# Altium PCB PCB_CubeIO_RTD_V1.0_20261024.PcbDoc (part 1 of 2)
Units mil, origin at the board's own origin, x right, y up, seen from the top; angles counter-clockwise.
Board outline 9739 x 8533 mil, 4 copper layers (TopLayer, GND, VCC, BottomLayer); 78 components, 50 nets, 272 pads, 89 vias.
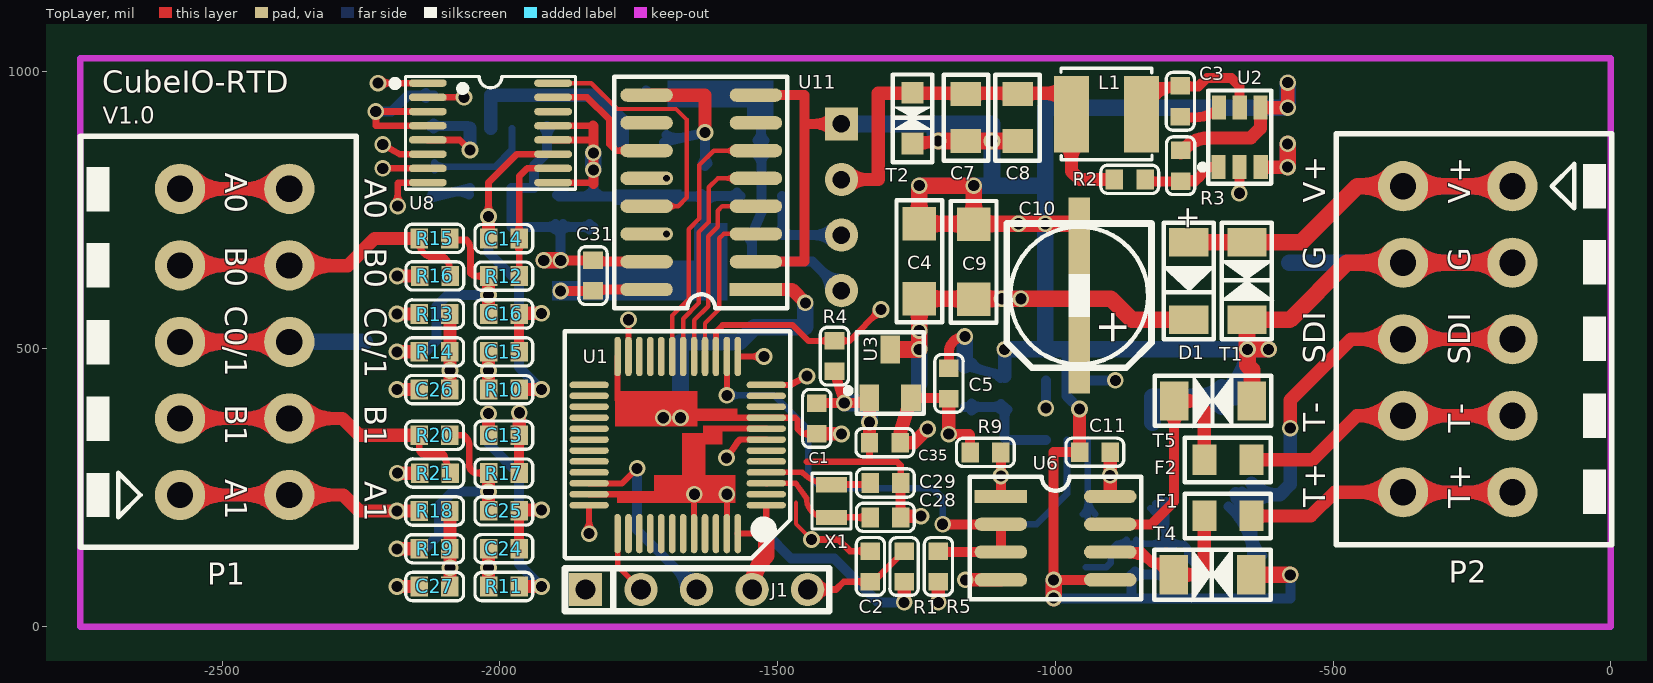
[diagram p0: TopLayer view]
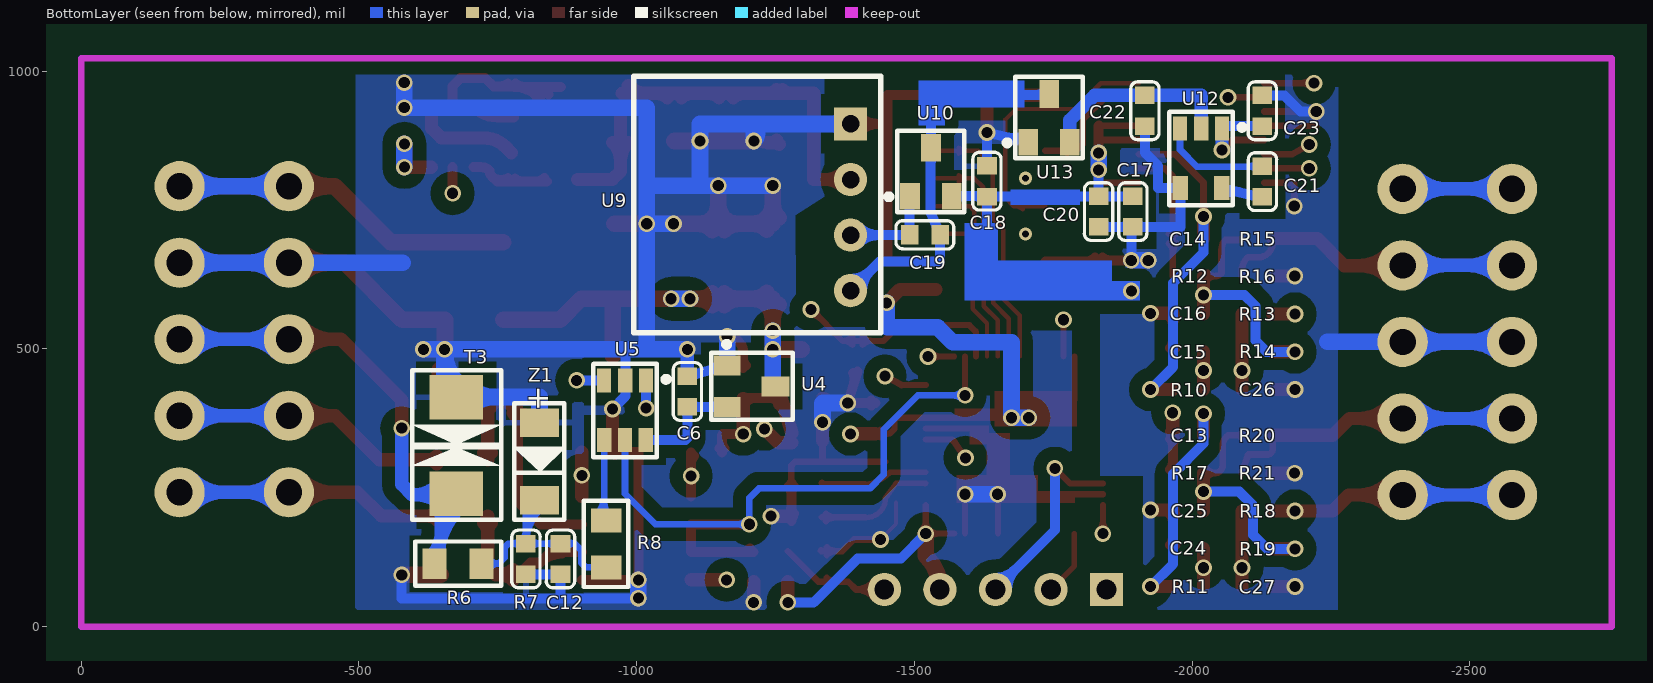
[diagram p1: BottomLayer view, seen from below]
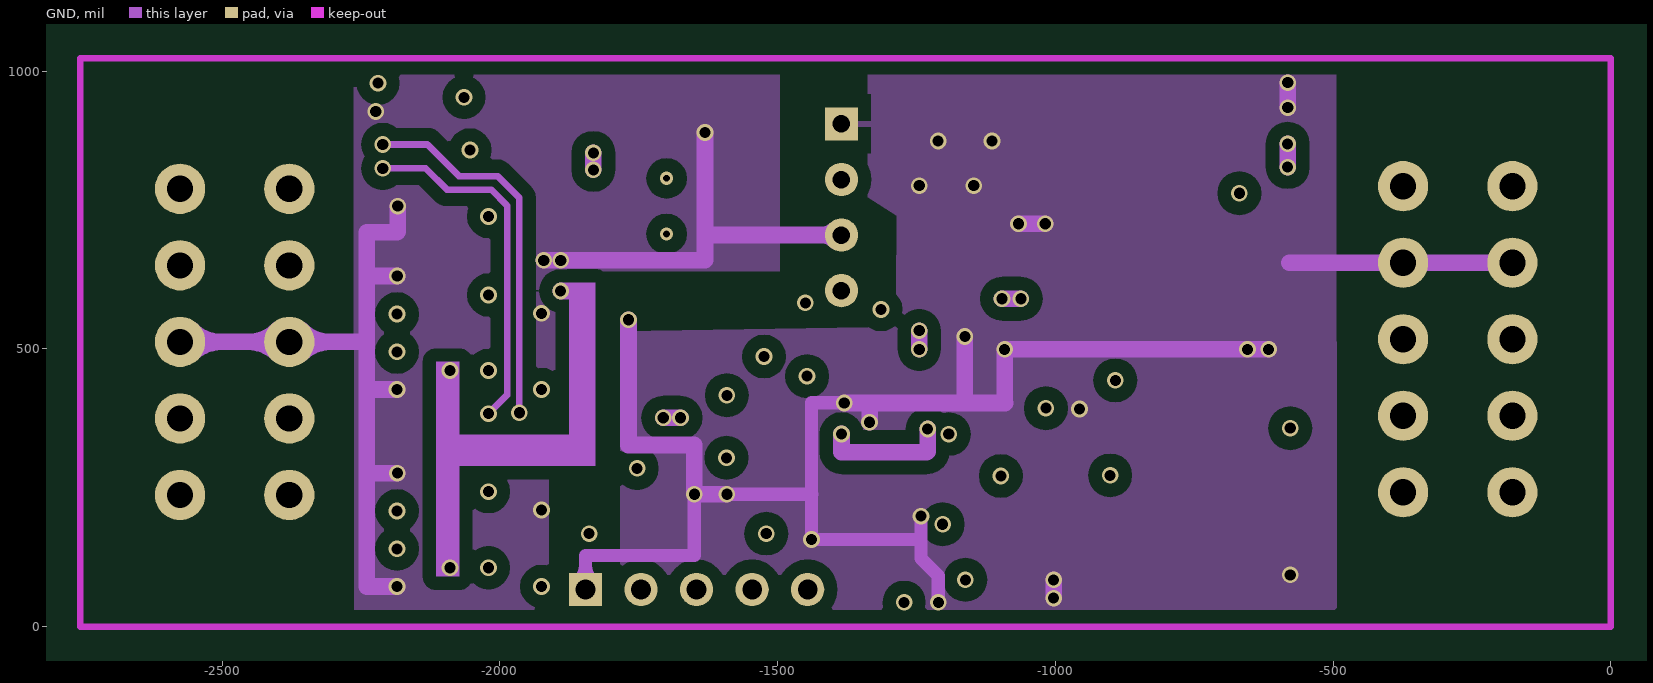
[diagram p2: GND]
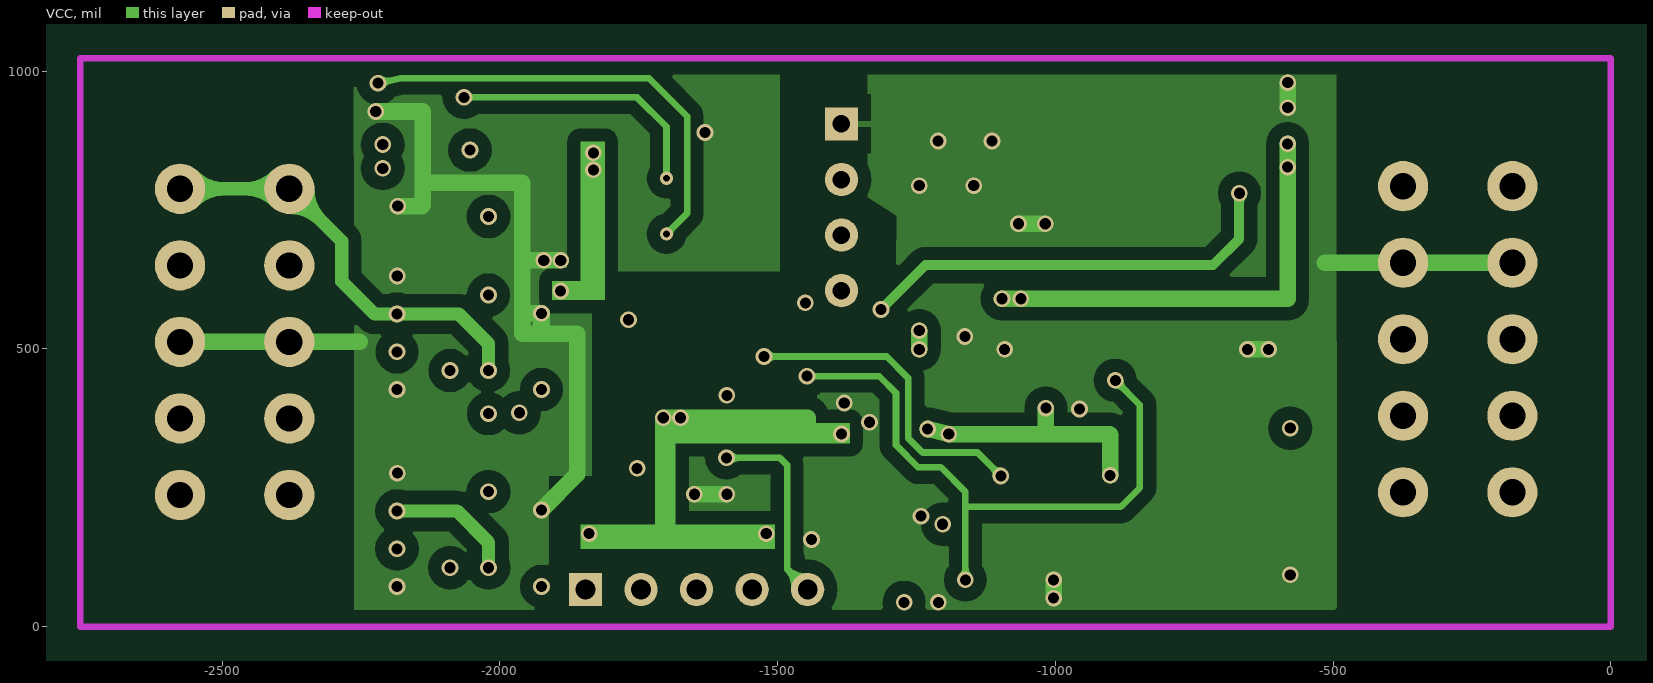
[diagram p3: VCC]

## Layer stack, top to bottom
TopLayer: signal copper 1.4
Dielectric: core 12.6, FR-4, Dk 4.8
GND: signal copper 1.4
Dielectric: prepreg 12.6, FR-4, Dk 4.8
VCC: signal copper 1.4
Dielectric: core 12.6, FR-4, Dk 4.8
BottomLayer: signal copper 1.4

## Board outline
-5100.31,4111.96 4638.69,4111.96 4638.69,-4391.04 -5100.31,-4391.04 -5100.31,4111.96 -5070.31,4141.96

## Design rules (kind name [scope] priority, off if disabled: settings)
Clearance [All] p1: gap=24
PolygonConnect Via [IsVia] p1: connectstyle=Direct reliefconductorwidth=10 reliefentries=4 polygonreliefangle="90 Angle"
PolygonConnect [All] p2: connectstyle=Relief reliefconductorwidth=10 reliefentries=4 polygonreliefangle="90 Angle"
RoutingLayers [All] p1: top layer_v5=TRUE mid layer 1_v5=FALSE mid layer 2_v5=FALSE bottom layer_v5=TRUE
RoutingPriority [All] p1: routingpriority=4
RoutingVias [All] p1: holewidth=20 width=30 viastyle="Through Hole" minholewidth=20 minwidth=30 maxholewidth=20 maxwidth=30
SilkscreenOverComponentPads [All] p1: minsilkscreentomaskgap=10
SolderMaskExpansion [All] p1: expansion=4
TestPointUsage [All] p1: valid=0 allowmultiple=FALSE
Testpoint [All] p1: side=15 testpointundercomponent=TRUE minsize=40 maxsize=100 preferedsize=60 minholesize=20 maxholesize=40 preferedholesize=32 testpointgrid=1 style=1023 order=0-112345678
Width [All] p1: maxlimit=236.22 minlimit=6 preferedwidth=8
21 further rules are at their usual default settings.

## Classes and differential pairs
component class AI: C13 C14 C15 C16 C17 C18 C19 C20 C21 C22 C23 C24 C25 C26 C27 C31 P1 R10 R11 R12 R13 R14 R15 R16 R17 R18 R19 R20 R21 U8 U9 U10 U11 U12 U13
component class CPU: 5 5.1K 6 BT1 C1 C2 C3 C4 C5 C6 C7 C8 C9 C10 C11 C12 C28 C29 C35 COM D1 D18 D19 F1 F2 J1 JTAG1 L1 L3 P2 P6 P7 P8 PWR PWR1 Q8 R1 R2 R3 R4 R5 R6 R7 R8 R9 RUN SW6 SW7 T1 T2 T3 T4 T5 U1 U2 U3 U4 U5 U6 X1 X2 X3 Z1
component class ATTACH: ATT1 ATT2 ATT3 ATT4 ATT5 ATT6 ATT7 ATT8 ATT9

## Components (designator, comment, footprint, x,y, rotation, side; value= is the part's Value field where it differs from the comment)
C1 "100nf/50V" RC0603(1) -1429.96,347.87 r90 top
C2 "100nf/50V" RC0603(1) -1333.38,81.28 r90 top
C3 "100nf/50V" RC0603(1) -774.59,972.87 r270 top
C4 "10uf/50V" RC1206 -1244.96,590.27 r90 top
C5 "10uf/25V" RC0603(1) -1191.96,410.85 r90 top
C6 "10uf/25V" RC0603(1) -1090.96,396.27 r90 bottom
C7 "22uf/16V" RC0805 -1160.96,958.87 r270 top
C8 "22uf/16V" RC0805 -1067.96,958.87 r270 top
C9 "10uf/50V" RC1206 -1146.96,589.27 r90 top
C10 "47uf/50V" SMD-EC-F6.3 -956.96,488.27 r90 top
C11 "100nf/50V" RC0603(1) -955.96,314.27 r0 top
C12 "220pf/50V" RC0603(1) -863.25,148.78 r270 bottom
C13 "10nf/50V" RC0603(1) -2020,345 r0 top
C14 "10nf/50V" RC0603(1) -2020,699 r0 top
C15 "100nf/50V" RC0603(1) -2020,495.19 r0 top
C16 "100nf/50V" RC0603(1) -2020,563.3 r0 top
C17 "10uf/25V" RC0603(1) -1893.72,774.38 r270 bottom
C18 "100nf/50V" RC0603(1) -1631,829 r270 bottom
C19 "10uf/25V" RC0603(1) -1546,705 r0 bottom
C20 "10uf/25V" RC0603(1) -1832,774.38 r270 bottom
C21 "10uf/25V" RC0603(1) -2126.29,774.08 r90 bottom
C22 "10uf/25V" RC0603(1) -1914.63,901.8 r90 bottom
C23 "10uf/25V" RC0603(1) -2126.75,955.8 r270 bottom
C24 "100nf/50V" RC0603(1) -2020,140.64 r0 top
C25 "100nf/50V" RC0603(1) -2020,208.75 r0 top
C26 "100nf/50V" RC0603(1) -2144.5,427.08 r0 top
C27 "100nf/50V" RC0603(1) -2144.5,72.53 r0 top
C28 "6pf(+/-0.25pf)/50V,COG" RC0603(1) -1278.96,196.27 r180 top
C29 "6pf(+/-0.25pf)/50V,COG" RC0603(1) -1278.96,258.27 r180 top
C31 "100nf/50V" RC0603(1) -1832,659 r270 top
C35 "10uf/25V" RC0603(1) -1279.96,330.87 r180 top
D1 "IN5819WS" SOD-123 -759.96,692.27 r270 top
F1 "自恢复保险丝50mA/60V" RC0805 -646.96,199.27 r180 top
F2 "自恢复保险丝50mA/60V" RC0805 -646.96,300.27 r180 top
J1 "单排针,5P" SIP-5(1) -1845.96,66.87 r180 top
L1 "10uH" SMD_L4.0-W4.0_FNR40XXS -907.96,922.87 r180 top
P1 "接线焊接焊盘" KC-2604P-3.5A-5P（快接侧出线直针,淘宝:宇宙悍将旗舰店） -2576,237 r90 top locked
P2 "外部接线焊盘" KC-2604P-3.5A-5P（快接侧出线直针,淘宝:宇宙悍将旗舰店） -177,793 r270 top locked
R1 "10K,1%" RC0603(1) -1271.96,135.27 r270 top
R2 "200K,1%" RC0603(1) -838.96,804.87 r180 top
R3 "62K,1%" RC0603(1) -773.96,856.87 r270 top
R4 "200K,1%" RC0603(1) -1397.96,459.87 r90 top
R5 "10K,1%" RC0603(1) -1210.96,81.27 r90 top
R6 "510ohm,1%" RC0805 -720.96,113.27 r0 bottom
R7 "200K,1%" RC0603(1) -800.25,94.78 r90 bottom
R8 "510ohm,1%" RC0805 -944.96,191.27 r270 bottom
R9 "5.1K,1%" RC0603(1) -1098.96,313.27 r180 top
R10 "2K,0.1%" RC0603(1) -2020,427.08 r0 top
R11 "2K,0.1%" RC0603(1) -2020,72.53 r0 top
R12 "2K,0.1%" RC0603(1) -2020,631.41 r0 top
R13 "20K,0.1%" RC0603(1) -2090.44,562.42 r180 top
R14 "20K,0.1%" RC0603(1) -2090.44,494.31 r180 top
R15 "300ohm,0.1%" RC0603(1) -2090.44,698.64 r180 top
R16 "20K,0.1%" RC0603(1) -2090,631 r180 top
R17 "2K,0.1%" RC0603(1) -2020,276.86 r0 top
R18 "20K,0.1%" RC0603(1) -2090.44,207.87 r180 top
R19 "20K,0.1%" RC0603(1) -2090.44,139.76 r180 top
R20 "300ohm,0.1%" RC0603(1) -2090.44,344.09 r180 top
R21 "20K,0.1%" RC0603(1) -2089.95,276 r180 top
T1 "SMF28CA" SOD-123-TVS -654.96,692.27 r270 top
T2 "GBLC05C" SOD-323-ESD-GBLCxx/UDD32CxxL01(1) -1257,961.1 r270 top
T3 "SMBJ28CA" "DO-214AA(SMB) -TVS" -674.96,239.27 r90 bottom
T4 "SMF6.5CA" SOD-123-TVS -786.96,93.27 r0 top
T5 "SMF6.5CA" SOD-123-TVS -785.96,406.27 r0 top
U1 "STM32L072CZT7" LQFP48_N -1679.96,326.87 r180 top
U2 "AP63200WU-7(ADJ)" SOT23-6(WIDEPAD) -705.96,827.27 r0 top
U3 "HT7533S" SOT23-3(1) -1334.96,411.87 r0 top
U4 "HT7550S" SOT23-3(1) -1162.96,470.27 r270 bottom
U5 "74LVC1T45DBVR" SOT23-6(WIDEPAD) -1016.96,443.27 r0 bottom
U6 "TP8485E-SR" SO-8-150mil -1097.96,234.27 r0 top
U8 "ADS1220IPWR" TSSOP-16_L5.0-W4.4-P0.65-LS6.4-BL -2017,889 r270 top
U9 "B0303S-1WR2(德旭电子)" MORSUN_B_S_1W-LAY -1385,905 r270 bottom
U10 "AP2210N-3.3TRG1" SOT23-3(1) -1492,775 r180 bottom
U11 "PAI-141U31" SO-16 -1539,607 r180 top
U12 "TPS60400DBVR" SOT23-5(WIDEPAD) -2054,897 r0 bottom
U13 "AP2210N-2.5TRE1" SOT23-3(1) -1705,872 r180 bottom
X1 "32.768kHz" OSC-2012-2P-SMD -1402.96,225.87 r270 top
Z1 "MMSZ4693(7.5V稳压管)" SOD-123 -824.96,367.27 r270 bottom

## Footprints (in the part's own frame and the unit in brackets; to place one, negate y for a bottom-side part, rotate by r counter-clockwise, add the part's x,y. Pads: shape width x height; smd on the part's side, far side on the other; paste and mask are expansions set on the pad)
"DO-214AA(SMB) -TVS" [mil]
  rect 80x96 smd: 1(0,0) 2(174,0)
  silkscreen extent -47,-82 222,80
KC-2604P-3.5A-5P（快接侧出线直针,淘宝:宇宙悍将旗舰店） [mm] "淘宝pokerface0411订单号: 5057329177195112327,宇宙悍将旗舰店"
  round 2.3 hole 1.2: 1(0,0) 1(0,-5) 2(3.5,-5) 2(3.5,0) 3(7,-5) 3(7,0) 4(10.5,-5) 4(10.5,0) 5(14,-5) 5(14,0)
  silkscreen extent -2.4,-8.05 16.4,4.55
LQFP48_N [mm] "Thin QFP, 48-Leads, Body 7x7mm, Pitch 0.5mm, IPC Medium Density"
  oval 1.8x0.3 smd: 1(-4.05,2.75) 2(-4.05,2.25) 3(-4.05,1.75) 4(-4.05,1.25) 5(-4.05,0.75) 6(-4.05,0.25) 7(-4.05,-0.25) 8(-4.05,-0.75) 9(-4.05,-1.25) 10(-4.05,-1.75) 11(-4.05,-2.25) 12(-4.05,-2.75) 25(4.05,-2.75) 26(4.05,-2.25) 27(4.05,-1.75) 28(4.05,-1.25) 29(4.05,-0.75) 30(4.05,-0.25) 31(4.05,0.25) 32(4.05,0.75) 33(4.05,1.25) 34(4.05,1.75) 35(4.05,2.25) 36(4.05,2.75)
  oval 0.3x1.8 smd: 13(-2.75,-4.05) 14(-2.25,-4.05) 15(-1.75,-4.05) 16(-1.25,-4.05) 17(-0.75,-4.05) 18(-0.25,-4.05) 19(0.25,-4.05) 20(0.75,-4.05) 21(1.25,-4.05) 22(1.75,-4.05) 23(2.25,-4.05) 24(2.75,-4.05) 37(2.75,4.05) 38(2.25,4.05) 39(1.75,4.05) 40(1.25,4.05) 41(0.75,4.05) 42(0.25,4.05) 43(-0.25,4.05) 44(-0.75,4.05) 45(-1.25,4.05) 46(-1.75,4.05) 47(-2.25,4.05) 48(-2.75,4.05)
  silkscreen extent -5.16,-5.21 5.16,5.18
MORSUN_B_S_1W-LAY [mil]
  rect 60x60 hole 31.5: 1(0,0)
  round 60 hole 31.5: 2(100,0) 3(200,0) 4(300,0)
  silkscreen extent -86,-390 376,55
OSC-2012-2P-SMD [mm]
  rect 0.7x1.4 smd: 1(-0.75,0) 2(0.75,0)
  silkscreen extent -1.27,-0.89 1.27,0.89
RC0603(1) [mm]
  rect 0.8x0.9 smd: 1(-0.013,-0.007) 2(1.387,-0.007)
  silkscreen extent -0.64,-0.66 2.01,0.64
RC0805 [mm]
  rect 1.1x1.4 smd: 1(0,0) 2(2.15,0)
  silkscreen extent -0.89,-1.02 3.05,1.02
RC1206 [mil] "1/4W 3.2X1.6"
  rect 60x60 smd: 1(0,0) 2(135,0)
  silkscreen extent -42,-41 177,41
SIP-5(1) [mil]
  rect 60x60 hole 35.43: 1(0,0)
  round 60 hole 35.43: 2(-100,0) 3(-200,0) 4(-300,0) 5(-400,0)
  silkscreen extent -439,-38 37,39
SMD-EC-F6.3 [mm]
  rect 3.5x1 smd: 1(0,0) 2(5.475,0)
  silkscreen extent -0.56,-3.31 6.04,3.31
SMD_L4.0-W4.0_FNR40XXS [mm]
  rect 1.6x3.5 smd: 1(-1.6,0) 2(1.6,0)
  silkscreen extent -2.08,-2.1 2.08,2.1
SO-8-150mil [mm]
  rect 2.4x0.61 smd: 1(0,0)
  oval 2.4x0.61 smd: 2(0,-1.27) 3(0,-2.54) 4(0,-3.81) 5(5,-3.81) 6(5,-2.54) 7(5,-1.27) 8(5,0)
  silkscreen extent -1.42,-4.7 6.43,0.89
SO-16 [mm]
  rect 2.4x0.61 smd: 1(0,0)
  oval 2.4x0.61 smd: 2(0,-1.27) 3(0,-2.54) 4(0,-3.81) 5(0,-5.08) 6(0,-6.35) 7(0,-7.62) 8(0,-8.89) 9(5,-8.89) 10(5,-7.62) 11(5,-6.35) 12(5,-5.08) 13(5,-3.81) 14(5,-2.54) 15(5,-1.27) 16(5.004,0)
  silkscreen extent -1.42,-9.73 6.48,0.85
SOD-123 [mm]
  rect 1.3x1.8 smd: 1(0,0) 2(3.556,0)
  silkscreen extent -0.89,-1.22 4.44,1.22
SOD-123-TVS [mm]
  rect 1.3x1.8 smd: 1(0,0) 2(3.556,0)
  silkscreen extent -0.89,-1.24 4.44,1.24
SOD-323-ESD-GBLCxx/UDD32CxxL01(1) [mm]
  rect 1x1 smd: 1(0,0) 2(2.32,0)
  silkscreen extent -0.84,-0.91 3.17,0.9
SOT23-3(1) [mm]
  rect 0.9x1.2 smd: 1(0,0) 2(1.905,0)
  rect 0.9x1.27 smd: 3(0.965,2.21)
  silkscreen extent -1.09,-0.74 2.49,3
SOT23-5(WIDEPAD) [mm]
  rect 0.65x1.1 smd: 1(0,0) 2(0.95,0) 3(1.925,0)
  rect 0.7x1.1 smd: 4(1.912,2.723) 5(0.012,2.723)
  silkscreen extent -1.04,-0.76 2.41,3.51
SOT23-6(WIDEPAD) [mm]
  rect 0.65x1.1 smd: 1(0,0) 2(0.95,0) 3(1.925,0) 4(1.912,2.723) 5(0.965,2.718) 6(0.012,2.723)
  silkscreen extent -0.86,-0.76 2.41,3.51
TSSOP-16_L5.0-W4.4-P0.65-LS6.4-BL [mil]
  oval 13.5x68.17 smd paste+2: 1(-89.57,-112.82) 2(-63.98,-112.82) 3(-38.39,-112.82) 4(-12.79,-112.82) 5(12.8,-112.82) 6(38.39,-112.82) 7(63.98,-112.82) 8(89.57,-112.82) 9(89.57,112.83) 10(63.98,112.83) 11(38.39,112.83) 12(12.8,112.83) 13(-12.79,112.83) 14(-38.39,112.83) 15(-63.98,112.83) 16(-89.57,112.83)
  silkscreen extent -101,-178 101,153

## Part data
C1 C2 C3 C11 C15 C16 C18 C24 C25 C26 C27 C31: library part CAP, "电容,100nf/50V,贴片,0603"
C4 C9: library part CAPACITOR_POL, "电容,10uf/50V,贴片,1206"
C5: library part ELECTRO1, "电容,10uf/25V,贴片,0805"
C6 C19 C20 C35: library part CAP, "电容,10uf/25V,贴片,0805"
C7 C8: library part ELECTRO1, "电容,22uf/16V,贴片,0805"
C10: library part CAPACITOR_POL, "电解电容,47uf/50V,贴片,D6.3L5.4"
C12: library part CAP, "电容,220pf/50V,贴片,0603"
C13 C14: library part CAP, "电容,10nf/50V,贴片,0603"
C17 C21 C22 C23: library part CAP, "电容,10uf/25V,贴片,0603"
C28 C29: library part CAP, "电容,6pf(+/-0.25pf)/50V,COG,贴片,0603"
D1: library part DIODE, "肖特基二极管,IN5819WS,贴片,SOD-123(1206)"
F1 F2: library part FUSE, "自恢复保险丝,自恢复保险丝50mA/60V,贴片,1206"
J1: library part "Header 5", "插针,单排针,直插,2.54MM间距,针高11MM,5P"
L1: library part INDUCTOR, "功率电感,10uH,20%,FHD4020S-100MT,贴片,SMD,4*4*2mm"
P1 P2: library part MHDR1X5, "Header, 5-Pin"
R1: library part RES_1, "电阻,10K,1%,贴片,0603"
R2 R4 R7: library part RESISTOR, "电阻,200K,1%,贴片,0603"
R3: library part RESISTOR, "电阻,62K,1%,贴片,0603"
R5: library part RESISTOR, "电阻,10K,1%,贴片,0603"
R6 R8: library part RESISTOR, "电阻,510ohm,1%,贴片,0805"
R9: library part RESISTOR, "电阻,5.1K,1%,贴片,0603"
R10 R11 R12 R17: library part RESISTOR, "电阻,2K,0.1%,贴片,0603"
R13 R14 R16 R18 R19 R21: library part RESISTOR, "电阻,20K,0.1%,贴片,0603"
R15 R20: library part RESISTOR, "电阻,300ohm,0.1%,贴片,0603"
T1 T3: library part TVS, "抗雷击二极管,SMF28CA,贴片,SOD-123"
T2: library part TVS, "抗雷击二极管,GBLC05C,贴片,SOD-323"
T4 T5: library part TVS, "抗雷击二极管,SMF6.5CA,贴片,SOD-123"
U1: library part STM32L051C8T6
U2: library part SCT2332(DC/DC), "电源,AP63200WU-7(ADJ),贴片,TSOT23-6L"
U3: library part HT7530S(UMW友台半导体), "电源,ME6203A33M3G(LDO,40V输入,3.3V输出),贴片,SOT-23"
U4: library part HT7530S(UMW友台半导体), "电源,ME6203A50M3G(LDO,40V输入,5V输出),贴片,SOT-23"
U5: library part 74LVC1T45, "74系列,74LVC1T45DBVR,贴片,SOT-23-6"
U6: library part MAX485, "RS485通讯,TP8485E-SR,贴片,SO-8"
U8: "AD转换器,ADS1220IPWR(24位AD转换),贴片,TSSOP-16"
U9: library part MORSUN_B0505S_1W, "电源DCDC,B0303S-1WR2(德旭电子),直插,SIP"
U10: library part HT7530S(UMW友台半导体), "电源,AP2210N-3.3TRG1(DIODES美台),贴片,SOT-23"
U11: "光耦,PAI-141U31,贴片,SO-16"
U12: library part TPS60400, "电源,TPS60400DBVR,贴片,SOT-23-5"
U13: library part HT7530S(UMW友台半导体), "电源,AP2210N-2.5TRE1(DIODES美台),贴片,SOT-23"
X1: library part XTAL, "晶振,SC-20S(32.768kHz,20PPM,7pF, Seiko精工),贴片,SMD-2012-2P"
Z1: library part ZENER, "稳压二极管,MMSZ4693(7.5V稳压管),贴片,SOD-123"

## Via types
v1: diameter 30, hole 20, TopLayer to BottomLayer, 87 vias
v2: diameter 24, hole 12, TopLayer to BottomLayer, 2 vias

## Nets (pads, with @x,y where several pads share a name; then routed paths per layer and width w, separated by ;. In a path a pad name is that pad's centre, name@x,y a point inside that pad or via, vN(x,y) a via of type N, cw(c..) or ccw(c..) an arc to the next point about the centre after c; other vN are vias at no path point)
+3V5: C7.1 C8.1 L1.2 R2.2 T2.1 U9.2 | length 1426.5
  TopLayer w24: U9.2@-1385,805 -1319,805 -1319,960 -1318.9,960.1 -1257,960.1 L1.2@-974,960.1 ; L1.2@-970.95,922.87 -970.95,819.95 -956.16,805.16 R2.2@-893.58,805.16 ; -1341.54,805 cw(c-1341.54,848.46) -1372.27,817.73 ccw(c-1341.54,848.46) -1341.54,805 ; -1341.54,805 ccw(c-1341.54,761.54) -1372.27,792.27 cw(c-1341.54,761.54) -1341.54,805 ; -970.95,838.4 cw(c-923.88,838.4) -957.16,871.69 ccw(c-923.88,838.4) -970.95,838.4 ; -970.95,838.4 ccw(c-1018.02,838.4) -984.74,871.69 cw(c-1018.02,838.4) -970.95,838.4 ; -1277.97,960.1 ccw(c-1277.97,982.07) -1262.43,966.54 cw(c-1277.97,982.07) -1277.97,960.1 ; T2.1@-1251.57,966.54 ccw(c-1236.03,982.07) -1236.03,960.1 cw(c-1236.03,982.07) T2.1@-1251.57,966.54 ; -1193.14,960.1 cw(c-1193.14,932.6) -1173.69,952.05 ccw(c-1193.14,932.6) -1193.14,960.1 ; C7.1@-1148.23,952.05 cw(c-1128.78,932.6) -1128.78,960.1 ccw(c-1128.78,932.6) C7.1@-1148.23,952.05 ; -1100.14,960.1 cw(c-1100.14,932.6) -1080.69,952.05 ccw(c-1100.14,932.6) -1100.14,960.1 ; C8.1@-1055.23,952.05 cw(c-1035.78,932.6) -1035.78,960.1 ccw(c-1035.78,932.6) C8.1@-1055.23,952.05 ; -1018.43,960.1 ccw(c-1018.43,1007.76) -984.74,974.06 cw(c-1018.43,1007.76) -1018.43,960.1 ; -1017.6,960.1 cw(c-1017.6,913.62) -984.74,946.49 ccw(c-1017.6,913.62) -1017.6,960.1
+5V: C6.1 U4.2 U5.6 | length 368.3
  BottomLayer w18: U4.2@-1162.96,395.27 -1162.46,395.78 C6.1@-1091.25,395.78 -1091.25,339.33 ; -1087.98,336.06 U5.6@-1016.49,336.06 ; -1109.51,395.78 cw(c-1109.51,379.49) -1097.99,391.01 ccw(c-1109.51,379.49) -1109.51,395.78 ; -1109.51,395.78 ccw(c-1109.51,412.07) -1097.99,400.55 cw(c-1109.51,412.07) -1109.51,395.78 ; -1091.25,379.49 cw(c-1074.96,379.49) -1086.48,391.01 ccw(c-1074.96,379.49) -1091.25,379.49 ; -1091.25,379.49 ccw(c-1107.54,379.49) -1096.02,391.01 cw(c-1107.54,379.49) -1091.25,379.49 ; U4.2@-1150.89,389.11 cw(c-1134.8,373.02) -1134.8,395.78 ccw(c-1134.8,373.02) U4.2@-1150.89,389.11 ; U4.2@-1150.89,401.44 ccw(c-1137.22,415.1) -1137.22,395.78 cw(c-1137.22,415.1) U4.2@-1150.89,401.44
+24V: C4.1 C9.1 C10.1 D1.2 U2.3 U3.3 U4.3 | length 2907.4
  TopLayer w24: U2.3@-630.16,827.27 v1(-581.73,827.27)
  TopLayer w30: U3.3@-1296.96,498.87 -1245.36,498.87 v1(-1244.96,499.27) ; v1@-1244.96,501.27 C4.1@-1244.96,590.27 -1031.96,590.27 -899.96,590.27 -861.96,552.27 -836.96,552.27 D1.2@-759.96,552.27 ; C10.1@-956.96,488.27 -956.96,587.31 -954,590.27 ; v1(-581.73,827.27) v1(-581.73,869.27) ; -1244.96,554.06 cw(c-1208.75,554.06) C4.1@-1234.35,579.67 ; -1244.96,554.06 ccw(c-1281.17,554.06) -1255.57,579.67 cw(c-1281.17,554.06) -1244.96,554.06 ; -1244.96,554.06 cw(c-1208.75,554.06) C4.1@-1234.35,579.67 ; C4.1@-1234.35,579.67 cw(c-1208.75,554.06) -1208.75,590.27 ; C4.1@-1234.35,579.67 cw(c-1208.75,554.06) -1208.75,590.27 ; -1208.75,590.27 cw(c-1208.75,626.49) -1234.35,600.88 ccw(c-1208.75,626.49) -1208.75,590.27 ; -1185.59,590.27 cw(c-1185.59,550.65) -1157.57,578.67 ccw(c-1185.59,550.65) -1185.59,590.27 ; -1180.76,590.27 ccw(c-1180.76,623.07) -1157.57,599.88 cw(c-1180.76,623.07) -1180.76,590.27 ; C9.1@-1136.35,578.67 cw(c-1108.33,550.65) -1108.33,590.27 ccw(c-1108.33,550.65) C9.1@-1136.35,578.67 ; C9.1@-1136.35,599.88 ccw(c-1113.16,623.07) -1113.16,590.27 cw(c-1113.16,623.07) C9.1@-1136.35,599.88
  GND w30: v1(-1244.96,499.27) v1(-1244.96,532.87) ; v1(-1096,590.27) v1(-1062,590.27) ; v1(-581.73,827.27) v1(-581.73,869.27)
  VCC w30: v1(-1244.96,499.27) v1(-1244.96,532.87) ; -587.27,590.27 v1(-1096,590.27) -581.73,590.27 v1(-581.73,827.27) v1(-581.73,869.27)
  BottomLayer w30: U4.3@-1244.96,437.27 v1(-1244.96,499.27) v1(-1244.96,532.87) ; v1(-1096,590.27) v1(-1062,590.27) ; v1(-581.73,827.27) v1(-581.73,869.27)
+24X: D1.1 P2.1 T1.1 | length 1740
  TopLayer w30: D1.1@-759.96,692.27 T1.1@-654.96,692.27 -556.73,692.27 -456,793 P2.1@-177,793 ; -446.94,793 cw(c-446.94,719.91) -395.26,771.59 ccw(c-446.94,719.91) -446.94,793 ; -446.94,793 ccw(c-446.94,866.09) -395.26,814.41 cw(c-446.94,866.09) -446.94,793 ; -300.76,793 cw(c-300.76,866.09) -352.44,814.41 ccw(c-300.76,866.09) -300.76,793 ; -300.76,793 ccw(c-300.76,719.91) -352.44,771.59 cw(c-300.76,719.91) -300.76,793 ; -250.09,793 cw(c-250.09,719.91) -198.41,771.59 ccw(c-250.09,719.91) -250.09,793 ; -250.09,793 ccw(c-250.09,866.09) -198.41,814.41 cw(c-250.09,866.09) -250.09,793
  BottomLayer w30: P2.1@-373.85,793 P2.1@-177,793 ; P2.1@-352.44,771.59 cw(c-300.76,719.91) -300.76,793 cw(c-300.76,866.09) P2.1@-352.44,814.41 ; P2.1@-198.41,771.59 ccw(c-250.09,719.91) -250.09,793 ccw(c-250.09,866.09) P2.1@-198.41,814.41
A: F1.2 T4.1 U6.6 | length 680.4
  TopLayer w18: U6.6@-901.11,134.27 -844.96,134.27 -825.96,115.27 ; T4.1@-786.96,93.27 -808.96,115.27 -825.96,115.27 ; -825.96,115.27 cw(c-825.96,91.04) -802.81,98.21 ccw(c-825.96,91.04) -825.96,115.27 ; U6.6@-865.87,131.27 cw(c-865.87,73.56) -825.06,114.37 ccw(c-865.87,73.56) U6.6@-865.87,131.27 ; U6.6@-864.99,131.41 cw(c-856.05,102.28) -834.51,123.82 ccw(c-856.05,102.28) U6.6@-864.99,131.41
  TopLayer w24: T4.1@-786.96,93.27 -745.96,93.27 -731.61,107.63 F1.2@-731.61,199.27 F1.2@-730.37,198.04 ; -754.15,93.27 cw(c-754.15,126.08) -777.35,102.88 ccw(c-754.15,126.08) -754.15,93.27 ; -754.15,93.27 ccw(c-754.15,60.46) -777.35,83.66 cw(c-754.15,60.46) -754.15,93.27 ; -731.61,170.06 cw(c-708.3,170.06) -724.78,186.54 ccw(c-708.3,170.06) -731.61,170.06 ; -731.61,170.06 ccw(c-754.91,170.06) -738.43,186.54 cw(c-754.91,170.06) -731.61,170.06
A0: C15.1 P1.5 R10.1 R13.2 | length 2545.5
  TopLayer w24: P1.5@-2576,788.18 P1.5@-2379.15,788.18 ; P1.5@-2552.47,764.65 cw(c-2495.67,707.85) -2495.67,788.18 cw(c-2495.67,868.52) P1.5@-2552.47,811.71 ; P1.5@-2402.68,764.65 ccw(c-2459.48,707.85) -2459.48,788.18 ccw(c-2459.48,868.52) P1.5@-2402.68,811.71 ; v1(-2185.23,562.71) R13.2@-2145.06,562.71 ; R10.1@-2020.5,426.79 C15.1@-2020.5,494.9
  VCC w24: P1.5@-2576,788.18 P1.5@-2379.15,788.18 ; P1.5@-2359.18,788.18 P1.5@-2379.15,788.18 ; v1(-2020.5,461) -2020.5,509.5 -2073.71,562.71 v1(-2185.23,562.71) -2225.71,562.71 -2285,622 -2285,694.03 P1.5@-2379.15,788.18 ; -2495.67,788.18 cw(c-2495.67,868.52) -2552.47,811.71 ccw(c-2495.67,868.52) -2495.67,788.18 ; -2495.67,788.18 ccw(c-2495.67,707.85) -2552.47,764.65 cw(c-2495.67,707.85) -2495.67,788.18 ; -2459.48,788.18 cw(c-2459.48,707.85) -2402.68,764.65 ccw(c-2459.48,707.85) -2459.48,788.18 ; -2459.48,788.18 ccw(c-2459.48,868.52) -2402.68,811.71 cw(c-2459.48,868.52) -2459.48,788.18 ; -2322.34,731.38 cw(c-2265.54,788.18) -2345.87,788.18 ccw(c-2265.54,788.18) -2322.34,731.38 ; -2322.34,731.38 ccw(c-2379.15,674.57) -2379.15,754.91 cw(c-2379.15,674.57) -2322.34,731.38
  BottomLayer w24: P1.5@-2576,788.18 P1.5@-2379.15,788.18 ; P1.5@-2552.47,764.65 cw(c-2495.67,707.85) -2495.67,788.18 cw(c-2495.67,868.52) P1.5@-2552.47,811.71 ; P1.5@-2402.68,764.65 ccw(c-2459.48,707.85) -2459.48,788.18 ccw(c-2459.48,868.52) P1.5@-2402.68,811.71
A1: C24.1 P1.1 R11.1 R18.2 | length 1951.1
  TopLayer w24: P1.1@-2576,237 -2282,237 -2253.16,208.16 v1(-2185.23,208.16) R18.2@-2145.06,208.16 ; R11.1@-2020.5,72.24 C24.1@-2020.5,140.35 ; -2495.67,237 cw(c-2495.67,317.33) -2552.47,260.53 ccw(c-2495.67,317.33) -2495.67,237 ; -2495.67,237 ccw(c-2495.67,156.67) -2552.47,213.47 cw(c-2495.67,156.67) -2495.67,237 ; -2459.48,237 cw(c-2459.48,156.67) -2402.68,213.47 ccw(c-2459.48,156.67) -2459.48,237 ; -2459.48,237 ccw(c-2459.48,317.33) -2402.68,260.53 cw(c-2459.48,317.33) -2459.48,237 ; -2298.82,237 cw(c-2298.82,317.33) -2355.62,260.53 ccw(c-2298.82,317.33) -2298.82,237 ; -2298.82,237 ccw(c-2298.82,156.67) -2355.62,213.47 cw(c-2298.82,156.67) -2298.82,237
  VCC w24: v1(-2185.23,208.16) -2077.16,208.16 -2020.5,151.5 v1(-2020.5,106)
  BottomLayer w24: P1.1@-2576,237 P1.1@-2379.15,237 ; P1.1@-2552.47,213.47 cw(c-2495.67,156.67) -2495.67,237 cw(c-2495.67,317.33) P1.1@-2552.47,260.53 ; P1.1@-2402.68,213.47 ccw(c-2459.48,156.67) -2459.48,237 ccw(c-2459.48,317.33) P1.1@-2402.68,260.53
ADC_CS: U8.2 U11.12 | length 544.8
  TopLayer w12: U8.2@-2129.82,952.98 v1(-2064.63,952.98)
  VCC w12: v1(-2064.63,952.98) -1752.98,952.98 -1700,900 v2(-1700,807)
ADC_DIN: U8.16 U11.13 | length 547.1
  TopLayer w8: U8.16@-1904.17,978.57 -1835.57,978.57 -1789,932 -1683,932 -1664,913 -1664,772 -1679,757 U11.13@-1735.85,757 ; -1681.29,757 cw(c-1681.29,776.31) -1694.95,762.66 ccw(c-1681.29,776.31) -1681.29,757 ; -1681.29,757 ccw(c-1681.29,737.69) -1694.95,751.34 cw(c-1681.29,737.69) -1681.29,757
ADC_DOUT_DRDY: U8.15 U11.11 | length 279.4
  TopLayer w12: U8.15@-1904.17,952.98 -1842.98,952.98 -1803,913 -1803,868.92 -1791.08,857 U11.11@-1735.85,857 ; -1785.58,857 cw(c-1785.58,842.51) -1775.34,852.76 ccw(c-1785.58,842.51) -1785.58,857 ; -1785.58,857 ccw(c-1785.58,871.49) -1775.34,861.24 cw(c-1785.58,871.49) -1785.58,857
ADC_SCLK: U8.1 U11.14 | length 1084.9
  TopLayer w12: v1(-2219.57,978.57) U8.1@-2129.82,978.57 ; -2197.84,978.57 cw(c-2197.84,1000.3) -2213.21,984.93 ccw(c-2197.84,1000.3) -2197.84,978.57 ; -2197.84,978.57 ccw(c-2197.84,956.84) -2213.21,972.21 cw(c-2197.84,956.84) -2197.84,978.57
  VCC w12: v1(-2219.57,978.57) -2178,987.43 -1731.42,987.43 -1663,919 -1663,744 v2(-1700,707) ; -2198.32,983.1 cw(c-2202.85,1004.35) -2214.67,986.12 ccw(c-2202.85,1004.35) -2198.32,983.1 ; -2198.32,983.1 ccw(c-2193.79,961.85) -2212.02,973.67 cw(c-2193.79,961.85) -2198.32,983.1 ; -1689.76,717.24 cw(c-1700,727.49) -1700,713 ccw(c-1700,727.49) -1689.76,717.24 ; -1689.76,717.24 ccw(c-1679.51,707) -1694,707 cw(c-1679.51,707) -1689.76,717.24
AGND: C15.2 C16.2 C17.2 C18.1 C19.2 C20.2 C22.1 C23.1 C24.2 C25.2 C26.1 C27.1 C31.1 P1.3 R16.2 R21.2 U8.3 U8.4 U8.8 U9.3 U10.1 U11.9 U11.15 U12.4 U13.1 | length 8497.7
  TopLayer w12: v1@-2224,927 v1(-2223.61,927.39) ; v1(-2184,757) -2184,798.43 -2183,799.43 U8.8@-2129.82,799.43 ; U8.4@-2129.82,901.79 -2223.21,901.79 -2223.21,926.99 v1(-2223.61,927.39) ; U8.3@-2129.82,927.39 v1(-2223.61,927.39) ; -2184,778.73 cw(c-2205.73,778.73) -2190.36,763.36 ccw(c-2205.73,778.73) -2184,778.73 ; -2184,778.73 ccw(c-2162.27,778.73) -2177.64,763.36 cw(c-2162.27,778.73) -2184,778.73
  TopLayer w18: C24.2@-1965.38,140.35 C25.2@-1965.38,208.46 ; C15.2@-1965.38,494.9 C16.2@-1965.38,563.01 ; v1(-1890.5,659.5) C31.1@-1832.29,659.5 -1829.79,657 U11.15@-1735.85,657 ; -1965.38,190.19 cw(c-1949.09,190.19) -1960.61,201.72 ccw(c-1949.09,190.19) -1965.38,190.19 ; -1965.38,190.2 ccw(c-1981.67,190.2) -1970.15,201.72 cw(c-1981.67,190.2) -1965.38,190.2 ; -1965.38,544.74 cw(c-1949.09,544.74) -1960.61,556.26 ccw(c-1949.09,544.74) -1965.38,544.74 ; -1965.38,544.75 ccw(c-1981.67,544.75) -1970.15,556.26 cw(c-1981.67,544.75) -1965.38,544.75 ; -1850.55,659.5 cw(c-1850.55,643.21) -1839.03,654.73 ccw(c-1850.55,643.21) -1850.55,659.5 ; -1850.55,659.5 ccw(c-1850.55,675.79) -1839.03,664.27 cw(c-1850.55,675.79) -1850.55,659.5 ; C24.2@-1970.15,147.09 ccw(c-1981.67,158.6) -1965.38,158.6 cw(c-1981.67,158.6) C24.2@-1970.15,147.09 ; C15.2@-1970.15,501.64 ccw(c-1981.67,513.15) -1965.38,513.15 cw(c-1981.67,513.15) C15.2@-1970.15,501.64 ; -1965.38,158.61 ccw(c-1949.09,158.61) -1960.61,147.09 cw(c-1949.09,158.61) -1965.38,158.61 ; -1965.38,513.16 ccw(c-1949.09,513.16) -1960.61,501.64 cw(c-1949.09,513.16) -1965.38,513.16 ; C31.1@-1825.55,664.27 ccw(c-1808,681.82) -1808,657 cw(c-1808,681.82) C31.1@-1825.55,664.27
  TopLayer w24: v1(-2185.17,72.24) C27.1@-2145,72.24 ; v1(-2185.17,426.79) C26.1@-2145,426.79 ; v1(-2184.79,631.29) R16.2@-2144.62,631.29 ; v1(-2184.73,276.29) R21.2@-2144.57,276.29 ; C25.2@-1965.44,210 v1(-1925.28,210) ; C16.2@-1965.44,564 v1(-1925.28,564) ; U11.9@-1735.85,957 -1631,957 -1630.71,956.29 v1(-1630.71,889.71)
  TopLayer w30: P1.3@-2576,512.59 P1.3@-2379.15,512.59 ; P1.3@-2554.59,491.18 cw(c-2502.91,439.5) -2502.91,512.59 cw(c-2502.91,585.68) P1.3@-2554.59,534 ; P1.3@-2400.56,491.18 ccw(c-2452.24,439.5) -2452.24,512.59 ccw(c-2452.24,585.68) P1.3@-2400.56,534 ; v1(-1921,659.5) v1(-1890.5,659.5)
  GND w30: P1.3@-2576,512.59 -2240.59,512.59 -2240,512 ; -2240,271 -2234.71,276.29 v1(-2184.73,276.29) ; -2240,425 -2238.21,426.79 v1(-2185.17,426.79) ; -2240,626 -2234.71,631.29 v1(-2184.79,631.29) ; v1(-2185.17,72.24) -2239.76,72.24 -2240,72 -2240,710 -2185,710 -2184,711 v1(-2184,757) ; v1(-1921,659.5) v1(-1890.5,659.5) -1631.21,659.5 -1630.71,659.99 -1630.71,735 ; v1(-1630.71,889.71) -1630.71,735 ; U9.3@-1385,705 -1630.71,705 -1630.71,735 ; -2502.91,512.59 cw(c-2502.91,585.68) -2554.59,534 ccw(c-2502.91,585.68) -2502.91,512.59 ; -2502.91,512.59 ccw(c-2502.91,439.5) -2554.59,491.18 cw(c-2502.91,439.5) -2502.91,512.59 ; -2452.24,512.59 cw(c-2452.24,439.5) -2400.56,491.18 ccw(c-2452.24,439.5) -2452.24,512.59 ; -2452.24,512.59 ccw(c-2452.24,585.68) -2400.56,534 cw(c-2452.24,585.68) -2452.24,512.59 ; -2306.06,512.59 cw(c-2306.06,585.68) -2357.74,534 ccw(c-2306.06,585.68) -2306.06,512.59 ; -2306.06,512.59 ccw(c-2306.06,439.5) -2357.74,491.18 cw(c-2306.06,439.5) -2306.06,512.59 ; -1421.21,705 cw(c-1421.21,668.79) -1395.61,694.39 ccw(c-1421.21,668.79) -1421.21,705 ; -1421.21,705 ccw(c-1421.21,741.21) -1395.61,715.61 cw(c-1421.21,741.21) -1421.21,705
  VCC w30: P1.3@-2576,512.59 -2252.59,512.59 ; v1(-2223.61,927.39) -2139,927.39 -2139,759 -2141,757 v1(-2184,757) ; -2139,797 -2136.57,799.43 -1960,799.43 -1960,658.87 ; -1960,563 -1959,564 v1(-1925.28,564) -1925.28,529.72 -1928,527 ; v1(-1925.28,210) -1861,274.28 -1861,527 -1960,527 -1960,658.87 ; v1(-1890.5,659.5) -1958.5,659.5 -1960,658.87
  BottomLayer w18: v1(-2223.61,927.39) -2195,927.39 -2166.09,956.3 C23.1@-2118.46,956.3 ; C22.1@-1914.92,901.3 -1914.92,853.38 -1939,829.3 -1939,789.58 -1939.21,789.79 U12.4@-1978.73,789.79 -1979,789.52 -1979,720 -1978.77,719.77 C17.2@-1893.43,719.77 ; v1(-1890.5,659.5) -1890.5,716.84 C17.2@-1893.43,719.77 ; C20.2@-1831.71,719.77 C17.2@-1893.43,719.77 ; U13.1@-1705,872 v1(-1630.71,889.71) C18.1@-1630.71,829.5 ; U10.1@-1492,775 -1491.38,774.38 C19.2@-1491.38,705.29 -1491.09,705 U9.3@-1385,705 ; -2144.72,956.3 cw(c-2144.72,940) -2133.2,951.52 ccw(c-2144.72,940) -2144.72,956.3 ; -2144.72,956.3 ccw(c-2144.72,972.59) -2133.2,961.07 cw(c-2144.72,972.59) -2144.72,956.3 ; -1914.92,885.01 cw(c-1898.63,885.01) -1910.15,896.53 ccw(c-1898.63,885.01) -1914.92,885.01 ; -1914.92,885.01 ccw(c-1931.21,885.01) -1919.69,896.53 cw(c-1931.21,885.01) -1914.92,885.01 ; -1911.69,719.77 cw(c-1911.69,703.47) -1900.17,714.99 ccw(c-1911.69,703.47) -1911.69,719.77 ; -1911.69,719.77 ccw(c-1911.69,736.06) -1900.17,724.54 cw(c-1911.69,736.06) -1911.69,719.77 ; -1875.17,719.77 cw(c-1875.17,736.06) -1886.69,724.54 ccw(c-1875.17,736.06) -1875.17,719.77 ; -1875.17,719.77 ccw(c-1875.17,703.47) -1886.69,714.99 cw(c-1875.17,703.47) -1875.17,719.77 ; -1849.97,719.77 cw(c-1849.97,703.47) -1838.45,714.99 ccw(c-1849.97,703.47) -1849.97,719.77 ; -1849.97,719.77 ccw(c-1849.97,736.06) -1838.45,724.54 cw(c-1849.97,736.06) -1849.97,719.77 ; -1630.71,845.79 cw(c-1647,845.79) -1635.48,834.27 ccw(c-1647,845.79) -1630.71,845.79 ; -1630.71,845.79 ccw(c-1614.42,845.79) -1625.94,834.27 cw(c-1614.42,845.79) -1630.71,845.79 ; -1491.38,723.55 cw(c-1507.67,723.55) -1496.15,712.03 ccw(c-1507.67,723.55) -1491.38,723.55 ; -1491.38,723.55 ccw(c-1475.09,723.55) -1486.61,712.03 cw(c-1475.09,723.55) -1491.38,723.55 ; -1435.7,705 cw(c-1435.7,654.3) -1399.85,690.15 ccw(c-1435.7,654.3) -1435.7,705 ; -1435.7,705 ccw(c-1435.7,755.7) -1399.85,719.85 cw(c-1435.7,755.7) -1435.7,705 ; C17.2@-1896.23,714.99 cw(c-1910.05,701.17) -1890.5,701.17 ccw(c-1910.05,701.17) C17.2@-1896.23,714.99 ; U13.1@-1700.43,885.33 ccw(c-1679.14,919.96) -1669.71,880.41 cw(c-1679.14,919.96) U13.1@-1700.43,885.33 ; C19.2@-1486.61,710.06 ccw(c-1474.39,722.28) -1474.39,705 cw(c-1474.39,722.28) C19.2@-1486.61,710.06
  BottomLayer w30: P1.3@-2576,512.59 P1.3@-2379.15,512.59 -2243.59,512.59 ; P1.3@-2554.59,491.18 cw(c-2502.91,439.5) -2502.91,512.59 cw(c-2502.91,585.68) P1.3@-2554.59,534 ; P1.3@-2400.56,491.18 ccw(c-2452.24,439.5) -2452.24,512.59 ccw(c-2452.24,585.68) P1.3@-2400.56,534 ; v1(-1921,659.5) v1(-1890.5,659.5)
AIN0+: C14.1 R10.2 U8.11 | length 697.4
  TopLayer w12: v1@-2020.5,738 -2020.5,799.5 -1969.39,850.61 U8.11@-1904.17,850.61 ; -2020.5,760.23 cw(c-2042.22,760.23) -2026.86,744.87 ccw(c-2042.22,760.23) -2020.5,760.23 ; -2020.5,760.23 ccw(c-1998.77,760.23) -2014.13,744.87 cw(c-1998.77,760.23) -2020.5,760.23
  TopLayer w24: C14.1@-2020.5,698.71 v1@-2020.5,738 ; R10.2@-1965.38,426.79 v1(-1925.21,426.79)
  BottomLayer w18: v1@-2020.5,738 -2020.5,673.73 -1965.44,618.68 -1965.44,467.02 v1(-1925.21,426.79)
  other v1: -2020.5,738.5
AIN0-: C14.2 R12.2 U8.10 | length 394.6
  TopLayer w12: R12.2@-1965.38,631.11 -1965.38,810.64 -1951,825.02 U8.10@-1904.17,825.02 ; -1965.38,724.21 cw(c-1988.91,724.21) -1972.27,707.57 ccw(c-1988.91,724.21) -1965.38,724.21 ; -1965.38,724.22 ccw(c-1941.85,724.22) -1958.49,707.57 cw(c-1941.85,724.22) -1965.38,724.22 ; C14.2@-1972.27,689.85 cw(c-1988.91,673.21) -1965.38,673.21 ccw(c-1988.91,673.21) C14.2@-1972.27,689.85 ; -1965.38,673.2 cw(c-1941.85,673.2) -1958.49,689.85 ccw(c-1941.85,673.2) -1965.38,673.2
AIN1+: C13.1 R11.2 U8.7 | length 1151
  TopLayer w12: v1(-2210.98,825.02) U8.7@-2129.82,825.02
  TopLayer w24: C13.1@-2020.5,344.71 v1(-2020.5,383.5) ; R11.2@-1965.38,72.24 v1(-1925.21,72.24)
  GND w12: v1(-2210.98,825.02) -2133.62,825.02 -2095.34,786.73 -2015.73,786.73 -1987,758 -1987,416.99 v1(-2020.5,383.5)
  BottomLayer w18: v1(-2020.5,383.5) -2020.5,329.5 -1965.44,274.44 -1965.44,112.47 v1(-1925.21,72.24)
AIN1-: C13.2 R17.2 U8.6 | length 1062.2
  TopLayer w12: v1(-2211,868) -2180.61,850.61 U8.6@-2129.82,850.61 ; v1@-1965.38,384.62 v1(-1965,385)
  TopLayer w18: R17.2@-1965.38,276.57 v1@-1965.38,384.62 ; -1965.38,294.82 cw(c-1981.67,294.82) -1970.15,283.31 ccw(c-1981.67,294.82) -1965.38,294.82 ; -1965.38,294.83 ccw(c-1949.09,294.83) -1960.61,283.31 cw(c-1949.09,294.83) -1965.38,294.83 ; -1965.38,326.45 cw(c-1949.09,326.45) -1960.61,337.97 ccw(c-1949.09,326.45) -1965.38,326.45 ; -1965.38,326.45 ccw(c-1981.67,326.45) -1970.15,337.97 cw(c-1981.67,326.45) -1965.38,326.45 ; -1965.38,362.97 cw(c-1981.67,362.97) -1970.15,351.45 ccw(c-1981.67,362.97) -1965.38,362.97 ; -1965.38,362.97 ccw(c-1949.09,362.97) -1960.61,351.45 cw(c-1949.09,362.97) -1965.38,362.97
  TopLayer w24: C13.2@-1965.38,344.71 v1@-1965.38,384.62 ; v1@-1965.38,384.62 cw(c-1965,384.62) v1(-1965,385) ; v1@-1965.38,384.62 cw(c-1965,384.62) v1(-1965,385) ; v1@-1965.38,384.62 cw(c-1965,384.62) v1(-1965,385)
  GND w12: v1(-2211,868) -2130.61,868 -2073.61,811 -2004.42,811 -1965,771.58 v1(-1965,385)
B: F2.2 T5.1 U6.7 | length 766
  TopLayer w18: U6.7@-901.11,184.27 -826.96,184.27 -785.96,225.27 T5.1@-785.96,406.27 ; -785.96,356.38 cw(c-745.91,356.38) -774.23,384.7 ccw(c-745.91,356.38) -785.96,356.38 ; -785.96,356.38 ccw(c-826.01,356.38) -797.69,384.7 cw(c-826.01,356.38) -785.96,356.38
  TopLayer w24: T5.1@-785.96,406.27 -747.96,406.27 -731.61,389.92 F2.2@-731.61,300.27 ; -753.15,406.27 cw(c-753.15,439.08) -776.35,415.88 ccw(c-753.15,439.08) -753.15,406.27 ; -753.15,406.27 ccw(c-753.15,373.46) -776.35,396.66 cw(c-753.15,373.46) -753.15,406.27 ; -731.61,329.49 cw(c-754.91,329.49) -738.43,313.01 ccw(c-754.91,329.49) -731.61,329.49 ; -731.61,329.49 ccw(c-708.3,329.49) -724.78,313.01 cw(c-708.3,329.49) -731.61,329.49
B0: P1.4 R15.2 R16.1 | length 1774.1
  TopLayer w12: R15.2@-2145.06,698.93 -2145.06,691.06 ccw(c-2119,691.06) -2119,665 -2100,665 cw(c-2125.34,639.66) -2089.5,639.66 R16.1@-2089.5,631.29 R16.1@-2089.5,643.37
  TopLayer w24: P1.4@-2576,650.39 P1.4@-2379.15,650.39 -2378.76,650 -2274,650 -2225.07,698.93 R15.2@-2145.06,698.93 ; -2495.67,650.39 cw(c-2495.67,730.72) -2552.47,673.92 ccw(c-2495.67,730.72) -2495.67,650.39 ; -2495.67,650.39 ccw(c-2495.67,570.05) -2552.47,626.86 cw(c-2495.67,570.05) -2495.67,650.39 ; -2459.48,650.39 cw(c-2459.48,570.05) -2402.68,626.86 ccw(c-2459.48,570.05) -2459.48,650.39 ; -2459.48,650.39 ccw(c-2459.48,730.72) -2402.68,673.92 cw(c-2459.48,730.72) -2459.48,650.39 ; P1.4@-2355.62,626.86 cw(c-2299.75,570.98) -2299.75,650 ccw(c-2299.75,570.98) P1.4@-2355.62,626.86 ; P1.4@-2355.62,673.92 ccw(c-2297.88,731.65) -2297.88,650 cw(c-2297.88,731.65) P1.4@-2355.62,673.92
  BottomLayer w24: P1.4@-2576,650.39 P1.4@-2379.15,650.39 ; P1.4@-2552.47,626.86 cw(c-2495.67,570.05) -2495.67,650.39 cw(c-2495.67,730.72) P1.4@-2552.47,673.92 ; P1.4@-2402.68,626.86 ccw(c-2459.48,570.05) -2459.48,650.39 ccw(c-2459.48,730.72) P1.4@-2402.68,673.92
B1: P1.2 R20.2 R21.1 | length 1767.1
  TopLayer w12: R20.2@-2145.06,344.38 -2145.06,319 ccw(c-2136.06,319) -2136.06,310 -2101,310 R21.1@-2089.45,276.29 R21.1@-2089.45,280.71
  TopLayer w24: P1.2@-2574.2,373 P1.2@-2576,374.8 -2283.8,374.8 -2282,373 -2253.38,344.38 R20.2@-2145.06,344.38 ; -2495.67,374.8 cw(c-2495.67,455.13) -2552.47,398.32 ccw(c-2495.67,455.13) -2495.67,374.8 ; -2495.67,374.8 ccw(c-2495.67,294.46) -2552.47,351.27 cw(c-2495.67,294.46) -2495.67,374.8 ; -2459.48,374.8 cw(c-2459.48,294.46) -2402.68,351.27 ccw(c-2459.48,294.46) -2459.48,374.8 ; -2459.48,374.8 ccw(c-2459.48,455.13) -2402.68,398.32 cw(c-2459.48,455.13) -2459.48,374.8 ; -2298.82,374.8 cw(c-2298.82,455.13) -2355.62,398.32 ccw(c-2298.82,455.13) -2298.82,374.8 ; -2298.82,374.8 ccw(c-2298.82,294.46) -2355.62,351.27 cw(c-2298.82,294.46) -2298.82,374.8
  BottomLayer w24: P1.2@-2576,374.8 P1.2@-2379.15,374.8 ; P1.2@-2552.47,351.27 cw(c-2495.67,294.46) -2495.67,374.8 cw(c-2495.67,455.13) P1.2@-2552.47,398.32 ; P1.2@-2402.68,351.27 ccw(c-2459.48,294.46) -2459.48,374.8 ccw(c-2459.48,455.13) P1.2@-2402.68,398.32
CPU_ADC_CS: U1.18 U11.5 | length 476.1
  TopLayer w8: U1.18@-1670.12,486.32 -1670.12,554.51 -1642,582.63 -1642,710.37 -1624,728.37 -1624,791 -1608,807 U11.5@-1539,807 ; -1593.56,807 cw(c-1593.56,787.69) -1579.9,801.34 ccw(c-1593.56,787.69) -1593.56,807 ; -1593.56,807 ccw(c-1593.56,826.31) -1579.9,812.66 cw(c-1593.56,826.31) -1593.56,807
CPU_ADC_DIN: U1.17 U11.4 | length 352.6
  TopLayer w8: U1.17@-1650.43,486.32 -1650.43,551.57 -1625,577 -1625,703 -1608,720 -1608,749 -1600,757 U11.4@-1539,757
CPU_ADC_DOUT_DRDY: U1.19 U11.6 | length 538.3
  TopLayer w8: U1.19@-1689.8,486.32 -1689.8,560.2 -1660,590 -1660,715.63 -1640.88,734.75 -1640.88,831.12 -1615,857 U11.6@-1539,857 ; -1593.56,857 cw(c-1593.56,837.69) -1579.9,851.34 ccw(c-1593.56,837.69) -1593.56,857 ; -1593.56,857 ccw(c-1593.56,876.31) -1579.9,862.66 cw(c-1593.56,876.31) -1593.56,857
CPU_ADC_SCLK: U1.16 U11.3 | length 292.7
  TopLayer w8: U1.16@-1630.75,486.32 -1630.75,546.25 -1605,572 -1605,699 -1597,707 U11.3@-1539,707
CPU_PWR1: R4.2 U1.15 U2.2 | length 1461.4
  TopLayer w11: U1.15@-1611.06,486.32 -1611.06,530.77 -1609.96,531.87 -1598.96,542.87 -1472.96,542.87 -1444.58,514.49 R4.2@-1397.67,514.49 -1370.51,514.49 v1(-1314,571) ; -1424.38,514.49 cw(c-1424.38,489.75) -1406.88,507.24 ccw(c-1424.38,489.75) -1424.38,514.49 ; -1424.38,514.49 ccw(c-1424.38,539.23) -1406.88,521.74 cw(c-1424.38,539.23) -1424.38,514.49 ; -1370.96,514.49 cw(c-1370.96,539.23) -1388.45,521.74 ccw(c-1370.96,539.23) -1370.96,514.49 ; -1370.96,514.49 ccw(c-1370.96,489.75) -1388.45,507.24 cw(c-1370.96,489.75) -1370.96,514.49 ; -1330.22,554.78 cw(c-1314,538.57) -1314,561.5 ccw(c-1314,538.57) -1330.22,554.78 ; -1330.22,554.78 ccw(c-1346.43,571) -1323.5,571 cw(c-1346.43,571) -1330.22,554.78
  TopLayer w18: v1(-668.56,780.27) U2.2@-668.56,827.27
  VCC w18: v1(-1314,571) -1234,651 -716,651 -669,698 -669,779.83 v1(-668.56,780.27) ; -669,764.72 cw(c-653,764.72) -664.32,776.03 ccw(c-653,764.72) -669,764.72
CPU_RXD: R9.1 U1.13 U6.1 | length 946.1
  TopLayer w10: U1.13@-1571.69,486.32 v1(-1524.41,486.32) ; -1548.55,486.32 cw(c-1548.55,462.18) -1531.48,479.25 ccw(c-1548.55,462.18) -1548.55,486.32 ; -1548.55,486.32 ccw(c-1548.55,510.46) -1531.48,493.39 cw(c-1548.55,510.46) -1548.55,486.32
  TopLayer w18: U6.1@-1097.96,234.27 R9.1@-1097.96,313.56 ; R9.1@-1103.24,306.82 cw(c-1115.98,294.08) -1097.96,294.08 ccw(c-1115.98,294.08) R9.1@-1103.24,306.82
  VCC w12: v1(-1524.41,486.32) -1303.41,486.32 -1264.96,447.87 -1264.96,411.87 -1264.96,339.68 -1238.85,313.56 -1140.25,313.56 v1(-1097.96,271.27) ; -1502.68,486.32 cw(c-1502.68,508.05) -1518.04,492.69 ccw(c-1502.68,508.05) -1502.68,486.32 ; -1502.68,486.32 ccw(c-1502.68,464.59) -1518.04,479.96 cw(c-1502.68,464.59) -1502.68,486.32 ; -1113.32,286.64 cw(c-1128.69,271.27) -1106.96,271.27 ccw(c-1128.69,271.27) -1113.32,286.64 ; -1113.32,286.64 ccw(c-1097.96,302) -1097.96,280.27 cw(c-1097.96,302) -1113.32,286.64